# Altium PCB Stepper-Driver-v2.0.PcbDoc (part 3 of 7)
Units mil, origin at the board's own origin, x right, y up, seen from the top; angles counter-clockwise.
Board outline 5905.51 x 4330.71 mil, 4 copper layers (Top Layer, Layer 1, Layer 2, Bottom Layer), stack 62.047 mil thick; 312 components, 285 nets, 1093 pads, 969 vias.
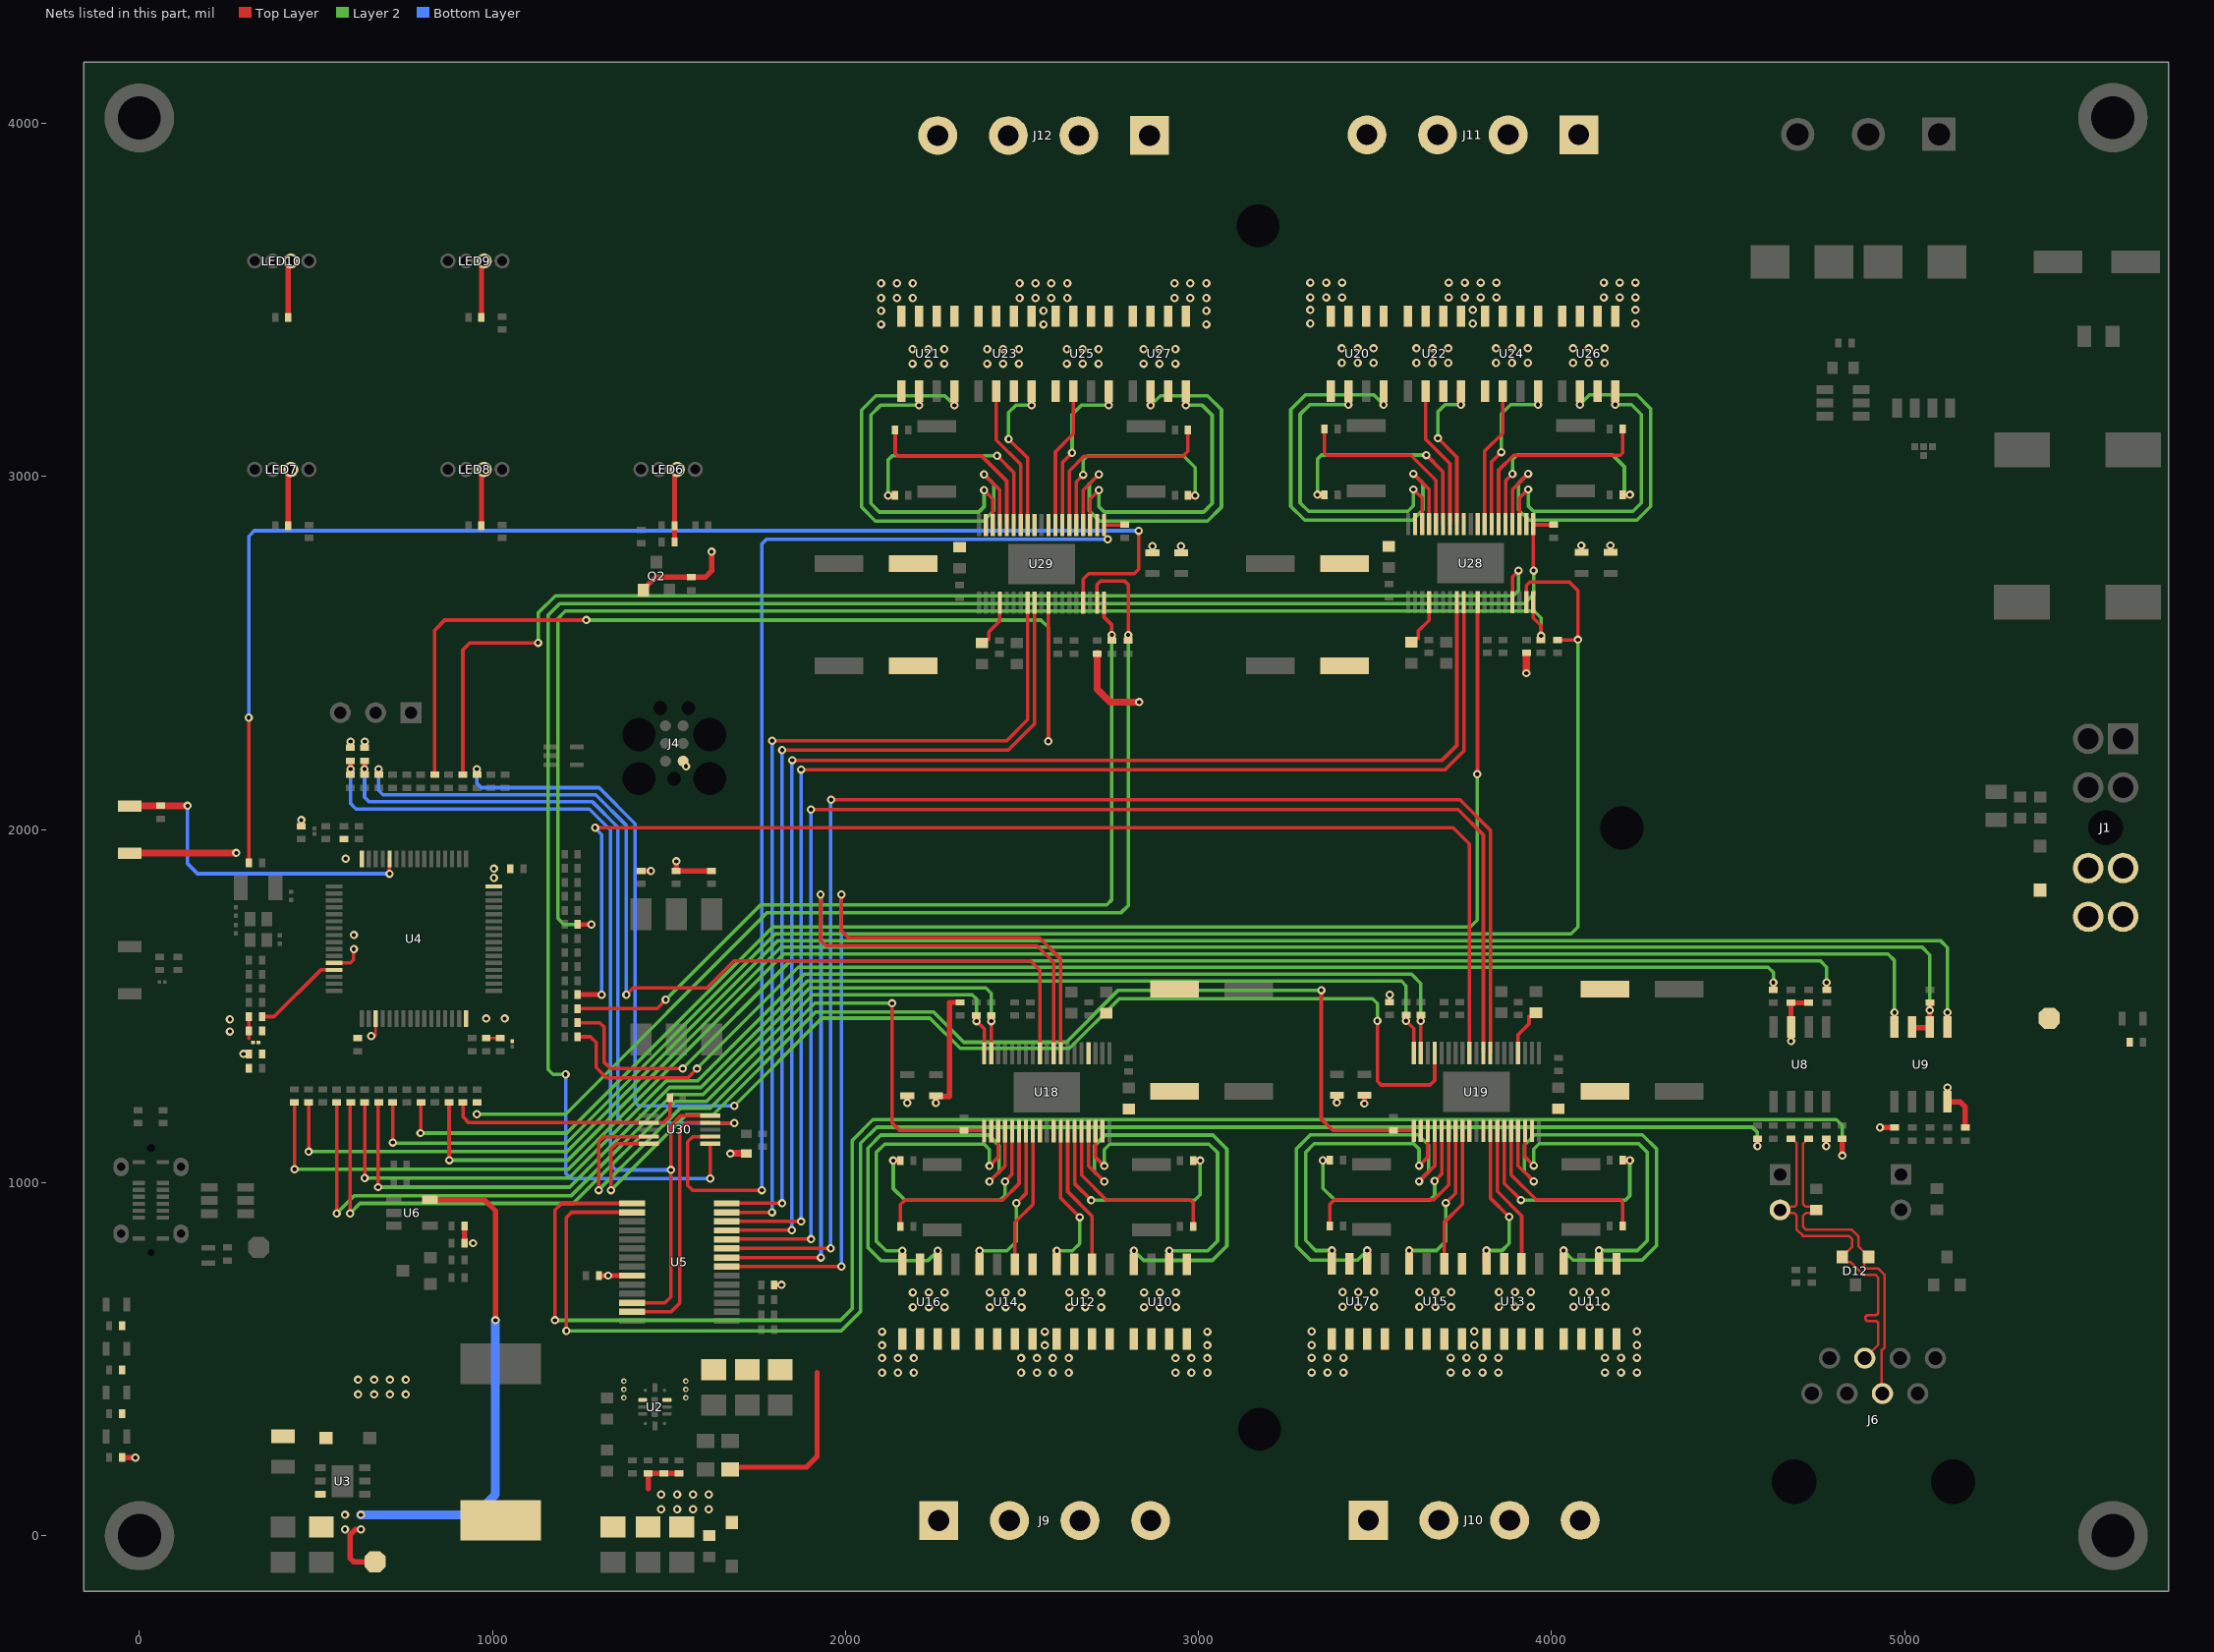
[diagram p4: the nets of this part, all layers, seen from the top]

## Part data (continued)
R70 R71 R76: library part RC0402FR-074K7L, "RES 4.7K OHM 1% 1/16W 0402", Case Code (Imperial)=0402, Case Code (Metric)=1005, LCSC Part Number=C105871, Manufacturer=Yageo, Max Operating Temperature=155°C, Max Power Dissipation=63mW, Min Operating Temperature=-55°C, Power Rating=62.5mW, Resistance=4.7kR, Resistance Tolerance=1%, Resistor Type="Thick Film", Temperature Coefficient=100ppm/°C, Voltage Rating=50V, Case/Package=0402, Category="Chip SMD Resistors", ComponentLink1Description=https://datasheet.ciiva.com/22661/1686128-22661342.pdf?src-supplier=Element14, ComponentLink1URL=https://datasheet.ciiva.com/22661/1686128-22661342.pdf?src-supplier=Element14, ComponentLink2Description=https://datasheet.ciiva.com/7850/1018594-7850022.pdf?src-supplier=Element14, ComponentLink2URL=https://datasheet.ciiva.com/7850/1018594-7850022.pdf?src-supplier=Element14, ComponentLink3Description=https://datasheet.ciiva.com/7850/1018594-7850023.pdf?src-supplier=Element14, ComponentLink3URL=https://datasheet.ciiva.com/7850/1018594-7850023.pdf?src-supplier=Element14, ComponentLink4Description=https://datasheet.ciiva.com/15215/getdatasheetpartid-328119-15215035.pdf?src-supplier=Verical, ComponentLink4URL=https://datasheet.ciiva.com/15215/getdatasheetpartid-328119-15215035.pdf?src-supplier=Verical, Construction=Rectangular, Depth=0.5mm, Features="Moisture Resistant", Height=0.32mm, Height - Seated (Max)=0.016inch, Item Type=Resistor, Lead Free="Lead Free", Length=1mm, Manufacturer Part Number=RC0402FR-074K7L, Military Standard=Not, Number of Pins=2, Number of Terminations=2, Packaging="Tape and Reel", Pricing 1="10000=0.00085 (USD)", Reach SVHC Compliant=Yes, RoHS=Yes, RoHS Compliant=Yes, Series=RC, Size Code=0402, Stock 1=2420000, Supplier 1=Avnet, Supplier Part Number 1=RC0402FR-074K7L, Termination=SMD/SMT, Tolerance=1%, Voltage Rating (DC)=50V, Width=0.5mm
R73 R75 R78: library part RC0402FR-0747KL, "RES 47K OHM 1% 1/16W 0402", Case Code (Imperial)=0402, Case Code (Metric)=1005, LCSC Part Number=C93943, Manufacturer=Yageo, Max Operating Temperature=155°C, Max Power Dissipation=63mW, Min Operating Temperature=-55°C, Package Quantity=1, Power Rating=62.5mW, Resistance=47kR, Resistance Tolerance=1%, Resistor Type="Thick Film", Temperature Coefficient=100ppm/°C, Voltage Rating=50V, Case/Package=0402, Category="Chip SMD Resistors", ComponentLink1Description=https://datasheet.ciiva.com/46412/1018594-46412839.pdf?src-supplier=Element14, ComponentLink1URL=https://datasheet.ciiva.com/46412/1018594-46412839.pdf?src-supplier=Element14, ComponentLink2Description=https://datasheet.ciiva.com/2453/pyu-r-int-thick-7-2453389.pdf?src-supplier=Digi-Key, ComponentLink2URL=https://datasheet.ciiva.com/2453/pyu-r-int-thick-7-2453389.pdf?src-supplier=Digi-Key, ComponentLink3Description=https://datasheet.ciiva.com/2453/pyu-r-int-thick-7-2453390.pdf?src-supplier=Digi-Key, ComponentLink3URL=https://datasheet.ciiva.com/2453/pyu-r-int-thick-7-2453390.pdf?src-supplier=Digi-Key, ComponentLink4Description=https://datasheet.ciiva.com/2453/pyu-r-int-thick-7-2453388.pdf?src-supplier=Digi-Key, ComponentLink4URL=https://datasheet.ciiva.com/2453/pyu-r-int-thick-7-2453388.pdf?src-supplier=Digi-Key, ComponentLink5Description=https://datasheet.ciiva.com/15189/getdatasheetpartid-323748-15189466.pdf?src-supplier=Verical, ComponentLink5URL=https://datasheet.ciiva.com/15189/getdatasheetpartid-323748-15189466.pdf?src-supplier=Verical, ComponentLink6Description=https://datasheet.ciiva.com/16793/pyu-rc0402-51-rohs-l-6-r-16793430.pdf?src-supplier=Future+Electronics, ComponentLink6URL=https://datasheet.ciiva.com/16793/pyu-rc0402-51-rohs-l-6-r-16793430.pdf?src-supplier=Future+Electronics, Construction=Rectangular, Depth=0.5mm, Features="Moisture Resistant", Height=0.016inch, Item Type=Resistor, Lead Free="Lead Free", Length=1mm, Manufacturer Part Number=RC0402FR-0747KL, Military Standard=Not, Number of Terminations=2, Packaging="Tape and Reel", Pricing 1="10000=0.00085, 20000=0.00087, 40000=0.00084, 60000=0.00083, 80000=0.00079, 100000=0.00078, 1000000=0.00076 (USD)", RoHS=Yes, RoHS Compliant=Yes, Series=RC, Size Code=0402, Stock 1=680000, Supplier 1=Avnet, Supplier Part Number 1=RC0402FR-0747KL, Termination=SMD/SMT, Tolerance=1%, Width=0.02inch
R77: library part RC0402FR-07200KL, "RES 200K OHM 1% 1/16W 0402", Case Code (Imperial)=0402, Case Code (Metric)=1005, LCSC Part Number=C114763, Manufacturer=Yageo, Max Operating Temperature=155°C, Max Power Dissipation=63mW, Min Operating Temperature=-55°C, Package Quantity=1, Resistance Tolerance=1%, Resistor Type="Thick Film", Temperature Coefficient=100ppm/°C, Voltage Rating=50V, Case/Package=0402, ComponentLink1Description=https://datasheet.ciiva.com/7849/1018594-7849897.pdf?src-supplier=Element14, ComponentLink1URL=https://datasheet.ciiva.com/7849/1018594-7849897.pdf?src-supplier=Element14, ComponentLink2Description=https://datasheet.ciiva.com/7849/1018594-7849896.pdf?src-supplier=Element14, ComponentLink2URL=https://datasheet.ciiva.com/7849/1018594-7849896.pdf?src-supplier=Element14, ComponentLink3Description=https://datasheet.ciiva.com/46394/1018594-46394953.pdf?src-supplier=Element14, ComponentLink3URL=https://datasheet.ciiva.com/46394/1018594-46394953.pdf?src-supplier=Element14, ComponentLink4Description=https://datasheet.ciiva.com/2453/pyu-r-int-thick-7-2453557.pdf?src-supplier=Digikey, ComponentLink4URL=https://datasheet.ciiva.com/2453/pyu-r-int-thick-7-2453557.pdf?src-supplier=Digikey, ComponentLink5Description=https://datasheet.ciiva.com/2453/pyu-r-int-thick-7-2453558.pdf?src-supplier=Digikey, ComponentLink5URL=https://datasheet.ciiva.com/2453/pyu-r-int-thick-7-2453558.pdf?src-supplier=Digikey, ComponentLink6Description=https://datasheet.ciiva.com/2453/pyu-r-int-thick-7-2453556.pdf?src-supplier=Digikey, ComponentLink6URL=https://datasheet.ciiva.com/2453/pyu-r-int-thick-7-2453556.pdf?src-supplier=Digikey, ComponentLink7Description=https://datasheet.ciiva.com/12667/pyu-rc0402-51-rohs-l-6-r-12667911.pdf?src-supplier=Mouser, ComponentLink7URL=https://datasheet.ciiva.com/12667/pyu-rc0402-51-rohs-l-6-r-12667911.pdf?src-supplier=Mouser, ComponentLink8Description=https://datasheet.ciiva.com/15189/getdatasheetpartid-323720-15189381.pdf?src-supplier=Verical, ComponentLink8URL=https://datasheet.ciiva.com/15189/getdatasheetpartid-323720-15189381.pdf?src-supplier=Verical, ComponentLink9Description=https://datasheet.ciiva.com/16740/pyu-rc0402-51-rohs-l-6-r-16740636.pdf?src-supplier=Future+Electronics, ComponentLink9URL=https://datasheet.ciiva.com/16740/pyu-rc0402-51-rohs-l-6-r-16740636.pdf?src-supplier=Future+Electronics, Construction=Rectangular, Depth=0.5mm, Features="Moisture Resistant", Height=0.016inch, Item Type=Resistor, Lead Free=5697LeadFree, Length=0.039inch, Manufacturer Part Number=RC0402FR-07200KL, Military Standard=Not, Number of Terminations=2, Packaging="Tape and Reel", Power Rating=63mW, Pricing="10000=0.0004, 50000=0.0008, 150000=0.0004, 300000=0.0007, 400000=0.0004, 1000000=0.0004, 2500000=0.0004, 3000000=0.0006 (USD)", Reach SVHC Compliant=Unknown, RoHS=Yes, RoHS Compliant=Yes, Series=RC, Stock=290000, Supplier="Future Electronics", Technology="THICK FILM", Termination=SMD/SMT, Tolerance=1%, Voltage Rating (DC)=50V, Width=0.02inch, Working Voltage=50V
R79: library part RC0402FR-07309KL, "RES 309K OHM 1% 1/16W 0402", Case Code (Imperial)=0402, Case Code (Metric)=1005, LCSC Part Number=C171694, Manufacturer=Yageo, Max Operating Temperature=155°C, Max Power Dissipation=63mW, Min Operating Temperature=-55°C, Power Rating=62.5mW, Supplier Part Number=2108207, Temperature Coefficient=100ppm/°C, Tolerance=1%, Voltage Rating=50V, Case/Package=0402, Category="Chip SMD Resistors", ComponentLink1Description=https://datasheet.ciiva.com/16743/pyu-rc0402-51-rohs-l-6-r-16743925.pdf?src-supplier=Future+Electronics, ComponentLink1URL=https://datasheet.ciiva.com/16743/pyu-rc0402-51-rohs-l-6-r-16743925.pdf?src-supplier=Future+Electronics, ComponentLink2Description=https://datasheet.ciiva.com/8886/pyu-rc0402-51-rohs-l-6-8886246.pdf?src-supplier=Avnet, ComponentLink2URL=https://datasheet.ciiva.com/8886/pyu-rc0402-51-rohs-l-6-8886246.pdf?src-supplier=Avnet, Contact Plating=Tin,Matte, Features="Moisture Resistant", Height=0.016inch, Item Type=Resistor, Lead Free="Lead Free", Length=0.039inch, Manufacturer Part Number=RC0402FR-07309KL, Number of Terminations=2, Packaging="Tape and Reel", Pricing="10000=0.0012, 100000=0.0011, 400000=0.0011, 1250000=0.001, 4000000=0.0009 (USD)", RoHS=Yes, RoHS Compliant=Yes, Series=RC, Stock=10000, Supplier="Future Electronics", Technology="THICK FILM", Termination=SMD/SMT, Voltage Rating (DC)=50V, Width=0.5mm, Working Voltage=50V
R80 R81: library part RC0402FR-075K1L, "RES 5.1K OHM 1% 1/16W 0402", Case Code (Imperial)=0402, Case Code (Metric)=1005, LCSC Part Number=C105872, Manufacturer=Yageo, Max Operating Temperature=155°C, Max Power Dissipation=63mW, Min Operating Temperature=-55°C, Package Quantity=1, Resistance=5.1kR, Resistance Tolerance=1%, Resistor Type="Thick Film", Temperature Coefficient=100ppm/°C, Voltage Rating=50V, Case/Package=0402, Category="Chip SMD Resistors", ComponentLink1Description=https://datasheet.ciiva.com/7983/1018594-7983519.pdf?src-supplier=Element14, ComponentLink1URL=https://datasheet.ciiva.com/7983/1018594-7983519.pdf?src-supplier=Element14, ComponentLink2Description=https://datasheet.ciiva.com/46394/1018594-46394936.pdf?src-supplier=Element14, ComponentLink2URL=https://datasheet.ciiva.com/46394/1018594-46394936.pdf?src-supplier=Element14, ComponentLink3Description=https://datasheet.ciiva.com/2453/pyu-r-int-thick-7-2453401.pdf?src-supplier=Digi-Key, ComponentLink3URL=https://datasheet.ciiva.com/2453/pyu-r-int-thick-7-2453401.pdf?src-supplier=Digi-Key, ComponentLink4Description=https://datasheet.ciiva.com/2453/pyu-r-int-thick-7-2453402.pdf?src-supplier=Digi-Key, ComponentLink4URL=https://datasheet.ciiva.com/2453/pyu-r-int-thick-7-2453402.pdf?src-supplier=Digi-Key, ComponentLink5Description=https://datasheet.ciiva.com/2453/pyu-r-int-thick-7-2453400.pdf?src-supplier=Digi-Key, ComponentLink5URL=https://datasheet.ciiva.com/2453/pyu-r-int-thick-7-2453400.pdf?src-supplier=Digi-Key, ComponentLink6Description=https://datasheet.ciiva.com/12558/pyu-rc0402-51-rohs-l-6-r-8721-12558460.pdf?src-supplier=Mouser, ComponentLink6URL=https://datasheet.ciiva.com/12558/pyu-rc0402-51-rohs-l-6-r-8721-12558460.pdf?src-supplier=Mouser, ComponentLink7Description=https://datasheet.ciiva.com/16744/pyu-rc0402-51-rohs-l-6-r-16744283.pdf?src-supplier=Future+Electronics, ComponentLink7URL=https://datasheet.ciiva.com/16744/pyu-rc0402-51-rohs-l-6-r-16744283.pdf?src-supplier=Future+Electronics, ComponentLink8Description=https://datasheet.ciiva.com/15189/getdatasheetpartid-323636-15189493.pdf?src-supplier=Verical, ComponentLink8URL=https://datasheet.ciiva.com/15189/getdatasheetpartid-323636-15189493.pdf?src-supplier=Verical, Construction=Rectangular, Depth=0.5mm, Features="Moisture Resistant", Height=0.016inch, Item Type=Resistor, Lead Free="Lead Free", Length=1mm, Manufacturer Part Number=RC0402FR-075K1L, Military Standard=Not, Number of Terminations=2, Packaging="Tape and Reel", Power Rating=63mW, Pricing 1="10000=0.00085 (USD)", RoHS=Yes, RoHS Compliant=Yes, Series=RC, Stock 1=65000, Supplier 1=Avnet, Supplier Part Number 1=RC0402FR-075K1L, Technology="THICK FILM", Termination=SMD/SMT, Tolerance=1%, Voltage Rating (DC)=50V, Width=0.02inch, Working Voltage=50V
R91 R96: library part RC0603FR-07120RL, "RES 120 OHM 1% 1/10W 0603", Case Code (Imperial)=0603, Case Code (Metric)=1608, LCSC Part Number=C114640, Manufacturer=Yageo, Max Operating Temperature=155°C, Max Power Dissipation=100mW, Min Operating Temperature=-55°C, Package Quantity=1, Resistance Tolerance=1%, Resistor Type="Thick Film", Supplier Part Number 1=311-120HRCT-ND, Temperature Coefficient=100ppm/°C, Voltage Rating=50V, Case/Package=0603, Category="Chip SMD Resistors", ComponentLink1Description=https://datasheet.ciiva.com/2553/pyu-r-int-thick-7-2553512.pdf?src-supplier=Digi-Key, ComponentLink1URL=https://datasheet.ciiva.com/2553/pyu-r-int-thick-7-2553512.pdf?src-supplier=Digi-Key, ComponentLink2Description=https://datasheet.ciiva.com/7746/443971-7746248.pdf?src-supplier=Element14, ComponentLink2URL=https://datasheet.ciiva.com/7746/443971-7746248.pdf?src-supplier=Element14, ComponentLink3Description=https://datasheet.ciiva.com/2553/pyu-r-int-thick-7-2553513.pdf?src-supplier=Digi-Key, ComponentLink3URL=https://datasheet.ciiva.com/2553/pyu-r-int-thick-7-2553513.pdf?src-supplier=Digi-Key, ComponentLink4Description=https://datasheet.ciiva.com/7746/443971-7746249.pdf?src-supplier=Element14, ComponentLink4URL=https://datasheet.ciiva.com/7746/443971-7746249.pdf?src-supplier=Element14, ComponentLink5Description=https://datasheet.ciiva.com/2553/pyu-r-int-thick-7-2553514.pdf?src-supplier=Digi-Key, ComponentLink5URL=https://datasheet.ciiva.com/2553/pyu-r-int-thick-7-2553514.pdf?src-supplier=Digi-Key, ComponentLink6Description=https://datasheet.ciiva.com/46395/443971-46395021.pdf?src-supplier=Element14, ComponentLink6URL=https://datasheet.ciiva.com/46395/443971-46395021.pdf?src-supplier=Element14, Construction=Rectangular, Depth=0.8mm, Features="Moisture Resistant", Height=0.022inch, Item Type=Resistor, Lead Free="Lead Free", Length=1.6mm, Manufacturer Part Number=RC0603FR-07120RL, Military Standard=Not, Number of Pins=2, Number of Terminations=2, Packaging="Tape and Reel", Power Rating=100mW, Pricing 1="1=0.10000, 10=0.02400, 100=0.00970, 1000=0.00436, 2500=0.00378 (USD)", REACH SVHC="No SVHC", Resistance=120R, RoHS=Yes, RoHS Compliant=Yes, Series=RC, Size Code=0603, Stock 1=839061, Supplier 1=Digi-Key, Termination=SMD/SMT, Tolerance=1%, Voltage Rating (DC)=50V, Width=0.031inch
R101 R102 R113 R114 R115 R116 R127 R128: library part RLM20FECR050, "1W 50mΩ Surface Mount Current Sensing Resistors ±50ppm/℃ ±1% 2010 Current Sense Resistors/Shunt Resistors ROHS", LCSC Part Number=C912938, Manufacturer="TA-I Tech", Package=2010, ComponentLink1Description=LCSC, ComponentLink1URL=https://www.lcsc.com/product-detail/Current-Sense-Resistors-Shunt-Resistors_TA-I-Tech-RLM20FECR050_C912938.html, Item Type="Shunt Resistor", Manufacturer Part Number=RLM20FECR050
R107 R108 R121 R122: library part RC0402FR-073K3L, "RES 3.3K OHM 1% 1/16W 0402", Case Code (Imperial)=0402, Case Code (Metric)=1005, LCSC Part Number=C137992, Manufacturer=Yageo, Max Operating Temperature=155°C, Max Power Dissipation=63mW, Min Operating Temperature=-55°C, Package Quantity=1, Power Rating=62.5mW, Resistance=3.3kR, Resistance Tolerance=1%, Resistor Type="Thick Film", Supplier Part Number 1=603-RC0402FR-073K3L, Temperature Coefficient=100ppm/°C, Voltage Rating=50V, Case/Package=0402, Category="Chip SMD Resistors", ComponentLink1Description=https://datasheet.ciiva.com/11808/0900766b80c66297-11808441.pdf?src-supplier=RSComponents, ComponentLink1URL=https://datasheet.ciiva.com/11808/0900766b80c66297-11808441.pdf?src-supplier=RSComponents, ComponentLink2Description=https://datasheet.ciiva.com/46394/1018594-46394940.pdf?src-supplier=Element14, ComponentLink2URL=https://datasheet.ciiva.com/46394/1018594-46394940.pdf?src-supplier=Element14, ComponentLink3Description=https://datasheet.ciiva.com/2453/pyu-r-int-thick-7-2453395.pdf?src-supplier=Digi-Key, ComponentLink3URL=https://datasheet.ciiva.com/2453/pyu-r-int-thick-7-2453395.pdf?src-supplier=Digi-Key, ComponentLink4Description=https://datasheet.ciiva.com/2453/pyu-r-int-thick-7-2453396.pdf?src-supplier=Digi-Key, ComponentLink4URL=https://datasheet.ciiva.com/2453/pyu-r-int-thick-7-2453396.pdf?src-supplier=Digi-Key, ComponentLink5Description=https://datasheet.ciiva.com/2453/pyu-r-int-thick-7-2453394.pdf?src-supplier=Digi-Key, ComponentLink5URL=https://datasheet.ciiva.com/2453/pyu-r-int-thick-7-2453394.pdf?src-supplier=Digi-Key, ComponentLink6Description=https://datasheet.ciiva.com/16746/pyu-rc0402-51-rohs-l-6-r-16746361.pdf?src-supplier=Future+Electronics, ComponentLink6URL=https://datasheet.ciiva.com/16746/pyu-rc0402-51-rohs-l-6-r-16746361.pdf?src-supplier=Future+Electronics, Construction=Rectangular, Depth=0.5mm, Features="Moisture Resistant", Height=0.016inch, Item Type=Resistor, Lead Free="Lead Free", Length=1mm, Manufacturer Part Number=RC0402FR-073K3L, Military Standard=Not, Number of Pins=2, Number of Terminations=2, Packaging="Tape and Reel", Pricing 1="1=0.10000, 10=0.01400, 50=0.01400, 100=0.00600, 1000=0.00300, 5000=0.00200, 10000=0.00100 (USD)", REACH SVHC="No SVHC", RoHS=Yes, RoHS Compliant=Yes, Series=RC, Size Code=0402, Stock 1=2413047, Supplier 1=Mouser, Technology="THICK FILM", Termination=SMD/SMT, Tolerance=1%, Voltage Rating (DC)=50V, Width=0.5mm
R109 R110 R111 R112 R123 R124 R125 R126: library part RC0402FR-07200RL, "RES 200 OHM 1% 1/16W 0402", Case Code (Imperial)=0402, Case Code (Metric)=1005, LCSC Part Number=C114764, Manufacturer=Yageo, Max Operating Temperature=155°C, Max Power Dissipation=63mW, Min Operating Temperature=-55°C, Package Quantity=1, Resistance Tolerance=1%, Resistor Type="Thick Film", Supplier Part Number 1=311-200LRCT-ND, Temperature Coefficient=100ppm/°C, Voltage Rating=50V, Case/Package=0402, Category="Chip SMD Resistors", ComponentLink1Description=https://datasheet.ciiva.com/2553/pyu-r-int-thick-7-2553232.pdf?src-supplier=Digi-Key, ComponentLink1URL=https://datasheet.ciiva.com/2553/pyu-r-int-thick-7-2553232.pdf?src-supplier=Digi-Key, ComponentLink2Description=https://datasheet.ciiva.com/7983/1018594-7983509.pdf?src-supplier=Element14, ComponentLink2URL=https://datasheet.ciiva.com/7983/1018594-7983509.pdf?src-supplier=Element14, ComponentLink3Description=https://datasheet.ciiva.com/16804/pyu-rc0402-51-rohs-l-6-r-16804406.pdf?src-supplier=Future+Electronics, ComponentLink3URL=https://datasheet.ciiva.com/16804/pyu-rc0402-51-rohs-l-6-r-16804406.pdf?src-supplier=Future+Electronics, ComponentLink4Description=https://datasheet.ciiva.com/15189/getdatasheetpartid-331152-15189383.pdf?src-supplier=Verical, ComponentLink4URL=https://datasheet.ciiva.com/15189/getdatasheetpartid-331152-15189383.pdf?src-supplier=Verical, ComponentLink5Description=https://datasheet.ciiva.com/7849/1018594-7849898.pdf?src-supplier=Element14, ComponentLink5URL=https://datasheet.ciiva.com/7849/1018594-7849898.pdf?src-supplier=Element14, ComponentLink6Description=https://datasheet.ciiva.com/5562/pyu-rc0402-51-rohs-l-6-r-8721-5562539.pdf?src-supplier=Mouser, ComponentLink6URL=https://datasheet.ciiva.com/5562/pyu-rc0402-51-rohs-l-6-r-8721-5562539.pdf?src-supplier=Mouser, ComponentLink7Description=https://datasheet.ciiva.com/7849/1018594-7849899.pdf?src-supplier=Element14, ComponentLink7URL=https://datasheet.ciiva.com/7849/1018594-7849899.pdf?src-supplier=Element14, ComponentLink8Description=https://datasheet.ciiva.com/2553/pyu-r-int-thick-7-2553230.pdf?src-supplier=Digi-Key, ComponentLink8URL=https://datasheet.ciiva.com/2553/pyu-r-int-thick-7-2553230.pdf?src-supplier=Digi-Key, ComponentLink9Description=https://datasheet.ciiva.com/2553/pyu-r-int-thick-7-2553231.pdf?src-supplier=Digi-Key, ComponentLink9URL=https://datasheet.ciiva.com/2553/pyu-r-int-thick-7-2553231.pdf?src-supplier=Digi-Key, Construction=Rectangular, Depth=0.5mm, Features="Moisture Resistant", Height=0.016inch, Lead Free="Lead Free", Length=1mm, Manufacturer Part Number=RC0402FR-07200RL, Military Standard=Not, Number of Terminations=2, Packaging="Tape and Reel", Power Rating=63mW, Pricing 1="1=0.10000, 10=0.01600, 100=0.00660, 1000=0.00299, 2500=0.00259, 5000=0.00214 (USD)", REACH SVHC="No SVHC", Resistance=200R, RoHS=Yes, RoHS Compliant=Yes, Series=RC, Size Code=0402, Stock 1=19778, Supplier 1=Digi-Key, Termination=SMD/SMT, Tolerance=1%, Voltage Rating (DC)=50V, Width=0.02inch
R130 R131: library part RC0402FR-07560RL, "RES 560 OHM 1% 1/16W 0402", Case Code (Imperial)=0402, Case Code (Metric)=1005, LCSC Part Number=C163460, Manufacturer=Yageo, Max Operating Temperature=155°C, Max Power Dissipation=63mW, Min Operating Temperature=-55°C, Package Quantity=1, Resistance Tolerance=1%, Resistor Type="Thick Film", Supplier Part Number=8872046, Temperature Coefficient=100ppm/°C, Voltage Rating=50V, Case/Package=0402, Category="Chip SMD Resistors", ComponentLink1Description=https://datasheet.ciiva.com/2453/pyu-r-int-thick-7-2453458.pdf?src-supplier=Digikey, ComponentLink1URL=https://datasheet.ciiva.com/2453/pyu-r-int-thick-7-2453458.pdf?src-supplier=Digikey, ComponentLink2Description=https://datasheet.ciiva.com/2453/pyu-r-int-thick-7-2453459.pdf?src-supplier=Digikey, ComponentLink2URL=https://datasheet.ciiva.com/2453/pyu-r-int-thick-7-2453459.pdf?src-supplier=Digikey, ComponentLink3Description=https://datasheet.ciiva.com/2453/pyu-r-int-thick-7-2453457.pdf?src-supplier=Digikey, ComponentLink3URL=https://datasheet.ciiva.com/2453/pyu-r-int-thick-7-2453457.pdf?src-supplier=Digikey, ComponentLink4Description=https://datasheet.ciiva.com/12558/pyu-rc0402-51-rohs-l-6-r-8721-12558383.pdf?src-supplier=Mouser, ComponentLink4URL=https://datasheet.ciiva.com/12558/pyu-rc0402-51-rohs-l-6-r-8721-12558383.pdf?src-supplier=Mouser, ComponentLink5Description=https://datasheet.ciiva.com/7850/1018594-7850042.pdf?src-supplier=Element14, ComponentLink5URL=https://datasheet.ciiva.com/7850/1018594-7850042.pdf?src-supplier=Element14, ComponentLink6Description=https://datasheet.ciiva.com/7850/1018594-7850043.pdf?src-supplier=Element14, ComponentLink6URL=https://datasheet.ciiva.com/7850/1018594-7850043.pdf?src-supplier=Element14, Construction=Rectangular, Depth=0.5mm, Features="Moisture Resistant", Height=0.016inch, Item Type=Resistor, Lead Free="Lead Free", Length=1mm, Manufacturer Part Number=RC0402FR-07560RL, Military Standard=Not, Number of Terminations=2, Packaging="Tape and Reel", Power Rating=63mW, Pricing="10000=0.0012, 100000=0.0011, 300000=0.0011, 1250000=0.001, 3000000=0.0009 (USD)", Reach SVHC Compliant=Unknown, RoHS=Yes, RoHS Compliant=Yes, Series=RC, Stock=1360000, Supplier="Future Electronics", Termination=SMD/SMT, Tolerance=1%, Width=0.02inch
SW1 SW3: "SWITCH TACTILE SPST-NO 0.05A 12V", Contact Current Rating=50mA, Contact Resistance=100mR, Insulation Resistance=100MR, LCSC Part Number=C231329, Manufacturer=Omron, Max Operating Temperature=70°C, Max Voltage Rating (DC)=12V, Min Operating Temperature=-25°C, Operating Force=1.5N, Package Quantity=1, Ratings="Dust Proof,IP40", Supplier Part Number 1=SW1020DKR-ND, Actuator Length=0.4mm, Actuator Type=Standard, ComponentLink1Description=http://www.farnell.com/datasheets/60838.pdf?src-supplier=Farnell, ComponentLink1URL=http://www.farnell.com/datasheets/60838.pdf?src-supplier=Farnell, ComponentLink2Description=http://www.farnell.com/datasheets/60838.pdf?src-supplier=Element14, ComponentLink2URL=http://www.farnell.com/datasheets/60838.pdf?src-supplier=Element14, ComponentLink3Description=https://omronfs.omron.com/en_US/ecb/products/pdf/en-b3u.pdf?src-supplier=Digi-Key, ComponentLink3URL=https://omronfs.omron.com/en_US/ecb/products/pdf/en-b3u.pdf?src-supplier=Digi-Key, ComponentLink4Description=http://www.omron.com/ecb/products/pdf/en-b3u.pdf?src-supplier=Digi-Key, ComponentLink4URL=http://www.omron.com/ecb/products/pdf/en-b3u.pdf?src-supplier=Digi-Key, ComponentLink5Description=https://www.distrelec.biz/Web/Downloads/he/et/B3U_eng_datasheet.pdf?mime=application%2Fpdf&src-supplier=Distrelec, ComponentLink5URL=https://www.distrelec.biz/Web/Downloads/he/et/B3U_eng_datasheet.pdf?mime=application%2Fpdf&src-supplier=Distrelec, ComponentLink6Description=http://www.onlinecomponents.com/productFiles/mf-OM/en-b3u.pdf?src-supplier=Onlinecomponents.com, ComponentLink6URL=http://www.onlinecomponents.com/productFiles/mf-OM/en-b3u.pdf?src-supplier=Onlinecomponents.com, ComponentLink7Description=https://www.verical.com/server-webapp/html/getDatasheet?partID=552554&src-supplier=Verical, ComponentLink7URL=https://www.verical.com/server-webapp/html/getDatasheet?partID=552554&src-supplier=Verical, ComponentLink8Description=http://www.farnell.com/datasheets/1685550.pdf?src-supplier=Element14, ComponentLink8URL=http://www.farnell.com/datasheets/1685550.pdf?src-supplier=Element14, ComponentLink9Description=http://www.farnell.com/datasheets/2610940.pdf?src-supplier=Farnell, ComponentLink9URL=http://www.farnell.com/datasheets/2610940.pdf?src-supplier=Farnell, ComponentLink10Description=https://www.alliedelec.com/m/d/4c8a9ef82804fc3c241a13c1e298fd73.pdf?src-supplier=Allied+Electronics, ComponentLink10URL=https://www.alliedelec.com/m/d/4c8a9ef82804fc3c241a13c1e298fd73.pdf?src-supplier=Allied+Electronics, Contact Material=Silver, Current Rating=50mA, Depth=2.5mm, Electrical Life=200000Cycles, Height=1.2mm, Illumination Type=Non-Illuminated,Illuminated, Item Type=Switch, Lead Free="Lead Free", Length=4mm, Manufacturer Part Number=B3U-1000P, Max Current Rating=50mA, Mechanical Life=200000Cycles, Mount="Surface Mount", Orientation=Straight, Packaging="Tape and Reel", Pricing 1="1=1, 10=0.961, 25=0.9064, 50=0.7976, 100=0.7251, 250=0.68888, 500=0.67074, 1000=0.52571 (USD)", REACH SVHC=Unknown, Stock 1=116454, Supplier 1=Digi-Key, Switch Function=Off-Mom, Switch Travel=0.15mm, Termination=SMD/SMT, Throw Configuration=SPST, Voltage Rating (DC)=12V, Weight=0.000776oz, Width=3mm
SW2: "3 positions SPST Black Flat Toggle, Raised Style SMD-6P,6x7.6mm DIP Switches ROHS", LCSC Part Number=C57453, Manufacturer="DongGuan KINGTEK Industrial Co.,LTD", Package=SMD-6P,6x7.6mm, ComponentLink1Description=LCSC, ComponentLink1URL=https://www.lcsc.com/product-detail/DIP-Switches_DongGuan-KINGTEK-Industrial-Co-LTD-DSIC03LSGET_C57453.html, Item Type="DIP Switches", Manufacturer Part Number=DSIC03LSGET
TP1 TP2 TP3: "Test Point ON", Item Type="TEST POINT"
U1: "OR Controller N+1 ORing Controller N-Channel 1:1 SOT-23-6", Case/Package=SOT-23-6, LCSC Part Number=C2941042, Manufacturer="Texas Instruments", Max Operating Temperature=125°C, Max Output current=5A, Max Supply Voltage=65V, Min Operating Temperature=-40°C, Min Supply Voltage=3.2V, Nominal Supply Current=80uA, Supplier Part Number=595-LM74700QDBVRQ1, Category="Power Management ICs", ComponentLink1Description=http://www.ti.com/general/docs/suppproductinfo.tsp?distId=10&amp;gotoUrl=http%3A%2F%2Fwww.ti.com%2Flit%2Fgpn%2Flm74700-q1&src-supplier=Digikey, ComponentLink1URL=http://www.ti.com/general/docs/suppproductinfo.tsp?distId=10&amp;gotoUrl=http%3A%2F%2Fwww.ti.com%2Flit%2Fgpn%2Flm74700-q1&src-supplier=Digikey, Height=1.45mm, Item Type=IC, Length=2.9mm, Manufacturer Part Number=LM74700QDBVRQ1, Mounting Technology="Surface Mount", Number of Outputs=1NUMBER, Pins=6NUMBER, Pricing="1=1.78, 10=1.6, 50=1.6, 100=1.28, 1000=0.877, 10000=0.756 (USD)", RoHS=Yes, RoHS Compliant=Yes, Series="Automotive, AEC-Q100", Stock=11505, Supplier=Mouser, Thickness=1.2mm, Turn-Off Delay Time=450ns, Turn-On Delay Time=1.4us, Width=1.6mm
U2: "IC REG BUCK ADJ 4A 13WQFN", LCSC Part Number=C3187981, Manufacturer="Texas Instruments", Item Type=IC, Manufacturer Part Number=LM60440AQRPKRQ1, Pricing="1=2.79, 10=1.91, 50=1.91, 100=1.71, 1000=1.52, 10000=1.45 (USD)", RoHS=Yes, Stock=916, Supplier=Mouser
U3: "IC REG LINEAR 3.3V 1.3A 6DFN", LCSC Part Number=C283488, Manufacturer=STMicroelectronics, ComponentLink1Description=https://datasheet.ciiva.com/2053/cd00186925-2053848.pdf?src-supplier=Digikey, ComponentLink1URL=https://datasheet.ciiva.com/2053/cd00186925-2053848.pdf?src-supplier=Digikey, ComponentLink2Description=https://datasheet.ciiva.com/2053/cd00186925-2053849.pdf?src-supplier=Digikey, ComponentLink2URL=https://datasheet.ciiva.com/2053/cd00186925-2053849.pdf?src-supplier=Digikey, ComponentLink3Description=https://datasheet.ciiva.com/2053/cd00186925-2053850.pdf?src-supplier=Digikey, ComponentLink3URL=https://datasheet.ciiva.com/2053/cd00186925-2053850.pdf?src-supplier=Digikey, ComponentLink4Description=https://datasheet.ciiva.com/16489/cd00186925-16489850.pdf?src-supplier=Future+Electronics, ComponentLink4URL=https://datasheet.ciiva.com/16489/cd00186925-16489850.pdf?src-supplier=Future+Electronics, Item Type=IC, Manufacturer Part Number=ST1L05APU33R, Pricing="1=1.06, 10=0.766, 25=0.692, 100=0.6103, 250=0.57136, 500=0.5479, 1000=0.5286 (USD)", RoHS=Yes, Stock=7599, Supplier=Digikey
U4: "IC MCU 32BIT 128KB FLASH 64LQFP", LCSC Part Number=C6807804, Manufacturer=STMicroelectronics, Item Type=IC, Manufacturer Part Number=STM32H503RBT6, Pricing="1=3.75, 10=2.6, 50=2.6, 100=2.28, 1000=2.09, 10000=1.98 (USD)", RoHS=No, Stock=991, Supplier=Mouser
U5: "IC XPNDR 1.7MHZ I2C 28SSOP", Case/Package=SSOP, Clock Frequency=10MHz, Frequency=1.7MHz, LCSC Part Number=C558584, Manufacturer=Microchip, Max Operating Temperature=125°C, Min Operating Temperature=-40°C, Nominal Supply Voltage=5.5V, Output Current=25mA, Package Quantity=2100, Power Dissipation=700mW, Supplier Part Number 1=MCP23017T-E/SSCT-ND, Supply Current=1mA, Category="Interface ICs", ComponentLink1Description=https://datasheet.ciiva.com/12267/21952b-12267583.pdf?src-supplier=Mouser, ComponentLink1URL=https://datasheet.ciiva.com/12267/21952b-12267583.pdf?src-supplier=Mouser, ComponentLink2Description=https://datasheet.ciiva.com/8128/21952b-8128586.pdf?src-supplier=Avnet, ComponentLink2URL=https://datasheet.ciiva.com/8128/21952b-8128586.pdf?src-supplier=Avnet, ComponentLink3Description=https://datasheet.ciiva.com/16454/filehandler-aspxddocname-en023709-16454267.pdf?src-supplier=Future+Electronics, ComponentLink3URL=https://datasheet.ciiva.com/16454/filehandler-aspxddocname-en023709-16454267.pdf?src-supplier=Future+Electronics, ComponentLink4Description=https://datasheet.ciiva.com/1780/21952b-1780738.pdf?src-supplier=Digi-Key, ComponentLink4URL=https://datasheet.ciiva.com/1780/21952b-1780738.pdf?src-supplier=Digi-Key, Interface=I2C,Serial, Item Type=IC, Lead Free="Lead Free", Manufacturer Part Number=MCP23017T-E/SS, Mounting Technology="Surface Mount", Number of Bits=16, Number of Channels=1, Number of I/Os=16, Operating Supply Voltage=5.5V, Output Type=PUSH-PULL, Packaging="Tape and Reel", Pins=28, Pricing 1="1=1.69, 25=1.4, 100=1.28 (USD)", RoHS=Yes, RoHS Compliant=Yes, Series=-, Stock 1=26314, Supplier 1=Digi-Key
U6: "IC PWR SWITCH N-CHAN 1:1 SOT23-5", Drain to Source Resistance=90mR, LCSC Part Number=C361034, Manufacturer=STMicroelectronics, Max Supply Voltage=5.5V, Min Supply Voltage=2.7V, Nominal Supply Voltage=5V, ComponentLink1Description=https://datasheet.ciiva.com/4923/cd00167470-116695-4923505.pdf?src-supplier=Mouser, ComponentLink1URL=https://datasheet.ciiva.com/4923/cd00167470-116695-4923505.pdf?src-supplier=Mouser, ComponentLink2Description=https://datasheet.ciiva.com/15108/getdatasheetpartid-66027-15108935.pdf?src-supplier=Verical, ComponentLink2URL=https://datasheet.ciiva.com/15108/getdatasheetpartid-66027-15108935.pdf?src-supplier=Verical, ComponentLink3Description=https://datasheet.ciiva.com/1962/cd00167470-1962487.pdf?src-supplier=Digikey, ComponentLink3URL=https://datasheet.ciiva.com/1962/cd00167470-1962487.pdf?src-supplier=Digikey, ComponentLink4Description=https://datasheet.ciiva.com/1962/cd00167470-1962488.pdf?src-supplier=Digikey, ComponentLink4URL=https://datasheet.ciiva.com/1962/cd00167470-1962488.pdf?src-supplier=Digikey, ComponentLink5Description=https://datasheet.ciiva.com/1962/cd00167470-1962489.pdf?src-supplier=Digikey, ComponentLink5URL=https://datasheet.ciiva.com/1962/cd00167470-1962489.pdf?src-supplier=Digikey, ComponentLink6Description=https://datasheet.ciiva.com/1512/1700527-1512630.pdf?src-supplier=Element14, ComponentLink6URL=https://datasheet.ciiva.com/1512/1700527-1512630.pdf?src-supplier=Element14, ComponentLink7Description=https://datasheet.ciiva.com/16491/cd00167470-16491224.pdf?src-supplier=Future+Electronics, ComponentLink7URL=https://datasheet.ciiva.com/16491/cd00167470-16491224.pdf?src-supplier=Future+Electronics, ComponentLink8Description=https://datasheet.ciiva.com/41457/001185713-da-01-en-ic-pwr-switch-stmps2161str-sot-23-5-stm-41457482.pdf?src-supplier=Conrad, ComponentLink8URL=https://datasheet.ciiva.com/41457/001185713-da-01-en-ic-pwr-switch-stmps2161str-sot-23-5-stm-41457482.pdf?src-supplier=Conrad, Height=1.45mm, Item Type=IC, Manufacturer Part Number=STMPS2161STR, Number of Channels=1NUMBER, Output Voltage=5V, Pricing="3000=0.42, 6000=0.41, 9000=0.405, 12000=0.405, 15000=0.395 (USD)", RoHS=Yes, Stock=3000, Supplier="Future Electronics"
U7: "6A 12V 150W 6V Unidirectional 5V SOT-23-6 ESD and Surge Protection (TVS/ESD) ROHS", LCSC Part Number=C2827654, Manufacturer="TECH PUBLIC", Package=SOT-23-6, ComponentLink1Description=LCSC, ComponentLink1URL=https://www.lcsc.com/product-detail/ESD-and-Surge-Protection-TVS-ESD_TECH-PUBLIC-USBLC6-2SC6_C2827654.html, Item Type=(TVS/ESD), Manufacturer Part Number=USBLC6-2SC6
U8: "IC TRANSCEIVER HALF 1/1 8SOIC", Case/Package=SOIC, LCSC Part Number=C22396693, Manufacturer="Texas Instruments", Height=1.75mm, Item Type=IC, Length=4.9mm, Manufacturer Part Number=TCAN3414DR, Pins=8, Pricing="1=1.55, 10=1.1, 50=1.1, 100=0.895, 1000=0.763, 10000=0.681 (USD)", RoHS=No, Stock=201, Supplier=Mouser, Thickness=1.58mm, Width=3.91mm
U9: "IC TRANSCEIVER HALF 1/1 8SOIC", LCSC Part Number=C3235059, Manufacturer="Texas Instruments", Item Type=IC, Manufacturer Part Number=THVD1449DR, Pricing="1=3.62, 10=2.51, 50=2.51, 100=2.27, 1000=2.02, 10000=1.95 (USD)", RoHS=No, Stock=7454, Supplier=Mouser
U10 U11 U12 U13 U14 U15 U16 U17 U20 U21 U22 U23 U24 U25 U26 U27: "MOSFET 2N-CH 60V 15A 8SOIC", LCSC Part Number=C117439, Manufacturer="Texas Instruments", ComponentLink1Description=https://datasheet.ciiva.com/29589/csd88537nd-29589985.pdf?src-supplier=Digikey, ComponentLink1URL=https://datasheet.ciiva.com/29589/csd88537nd-29589985.pdf?src-supplier=Digikey, ComponentLink2Description=https://datasheet.ciiva.com/46430/1857624-46430364.pdf?src-supplier=Element14, ComponentLink2URL=https://datasheet.ciiva.com/46430/1857624-46430364.pdf?src-supplier=Element14, Item Type=IC, Manufacturer Part Number=CSD88537ND, Pricing="1=1.26, 10=1.03, 50=1.03, 100=0.8, 1000=0.552, 10000=0.494 (USD)", RoHS=Yes, Stock=24825, Supplier=Mouser
U18 U19 U28 U29: "IC MTR DRV BIPOLR 8-52V 38HTSSOP", Case/Package=HTSSOP, LCSC Part Number=C60013, Manufacturer="Texas Instruments", Max Operating Temperature=85°C, Max Supply Voltage=52V, Min Operating Temperature=-40°C, Min Supply Voltage=8V, Output Current=200mA, Output Voltage=5V, Package Quantity=2000, Supply Current=17mA, ComponentLink1Description=https://datasheet.ciiva.com/24016/slvsc40d-317294-24016712.pdf?src-supplier=Mouser, ComponentLink1URL=https://datasheet.ciiva.com/24016/slvsc40d-317294-24016712.pdf?src-supplier=Mouser, Interface=SPI, Item Type=IC, Lead Free="Lead Free", Manufacturer Part Number=DRV8711DCPR, Mounting Technology="Surface Mount", Packaging="Tape and Reel", Pins=38, Pricing="1=4.97, 10=4.29, 50=4.29, 100=3.66, 1000=2.63, 10000=2.48 (USD)", Radiation Hardening=No, RoHS=Yes, RoHS Compliant=Yes, Series=-, Stock=9050, Supplier=Mouser
U30: "IC ADC 16BIT SIGMA-DELTA 10VSSOP", Case/Package=VSSOP, LCSC Part Number=C37593, Manufacturer="Texas Instruments", Max Operating Temperature=125°C, Max Supply Voltage=5.5V, Min Operating Temperature=-40°C, Min Supply Voltage=2V, Nominal Supply Current=150uA, Package Quantity=2500, Power Dissipation=900uW, Supplier Part Number=595-ADS1115IDGSR, Category="Analog to Digital Converters (ADCs)", ComponentLink1Description=https://datasheet.ciiva.com/4031/47725463s8438921n7713-4031028.pdf?src-supplier=Arrow+Electronics, ComponentLink1URL=https://datasheet.ciiva.com/4031/47725463s8438921n7713-4031028.pdf?src-supplier=Arrow+Electronics, Contact Plating=Gold, Conversion Rate=0.86KS/s, Height=1.07mm, Integral Nonlinearity (INL)=1LSB, Interface=I2C, Item Type=IC, Lead Free="Lead Free", Length=3mm, Manufacturer Part Number=ADS1115IDGSR, Max Supply Voltage (DC)=5.5V, Min Supply Voltage (DC)=2V, Number of A/D Converters=1, Number of Bits=16, Number of Channels=2, Number of Converters=1, Number of Inputs=4, Packaging="Tape and Reel", Pins=10, Polarity=Bipolar, Pricing="1=5.44, 10=4.76, 50=4.76, 100=4.01, 1000=2.88, 10000=2.78 (USD)", Reach SVHC Compliant=No, Resolution=16b, RoHS=Yes, RoHS Compliant=Yes, Sampling Rate=860S/s, Series=-, Stock=5925, Supplier=Mouser, Supply Type=Single, Thickness=1.02mm, Width=3mm
X1: library part XL7EL89COI-111YLC-24M, "24MHz Surface Mount Crystal 12pF ±10ppm ±20ppm SMD2016-4P Crystals ROHS", LCSC Part Number=C22434877, Manufacturer=YXC, Package=SMD2016-4, ComponentLink1Description=LCSC, ComponentLink1URL=https://www.lcsc.com/product-detail/Crystals_YXC-Crystal-Oscillators-XL7EL89COI-111YLC-24M_C22434877.html, Item Type=Crystal, Manufacturer Part Number=XL7EL89COI-111YLC-24M
X2: library part NX3215SA-32.768K-STD-MUA-8, "CRYSTAL 32.7680KHZ 12.5PF SMD", Case/Package=SMD/SMT, ESR (Equivalent Series Resistance)=70kR, Frequency=32.768kHz, Frequency Tolerance=20ppm, LCSC Part Number=C156245, Load Capacitance=12.5pF, Manufacturer=NDK, Max Operating Temperature=85°C, Min Operating Temperature=-40°C, Package Quantity=1000, Supplier Part Number 1=644-1156-6-ND, ComponentLink1Description=https://media.digikey.com/pdf/Data%20Sheets/NDK%20PDFs/NX3215SA-32.768K-STD-MUA-8.pdf?src-supplier=Digi-Key, ComponentLink1URL=https://media.digikey.com/pdf/Data%20Sheets/NDK%20PDFs/NX3215SA-32.768K-STD-MUA-8.pdf?src-supplier=Digi-Key, ComponentLink2Description=http://www.ndk.com/images/products/catalog/c_NX3215SA-STD-MUA-14_e.pdf?src-supplier=Digi-Key, ComponentLink2URL=http://www.ndk.com/images/products/catalog/c_NX3215SA-STD-MUA-14_e.pdf?src-supplier=Digi-Key, Height=0.035inch, Lead Free="Lead Free", Length=0.126inch, Manufacturer Part Number=NX3215SA-32.768K-STD-MUA-8, Mount="Surface Mount", Number of Pins=2, Packaging="Tape and Reel", Pricing 1="1=0.68, 10=0.602, 50=0.5628, 100=0.4974, 500=0.47124, 1000=0.3927 (USD)", Stock 1=29951, Supplier 1=Digi-Key, Width=0.059inch

## Free pads (board coordinates)
  round 196.85 hole 122.05: MH1(-0.74,4015.75) MH1(0,0) MH1(5589.82,4016.48) MH1(5590.18,0.37)
  round 0 hole 122.05: MH1(3168.63,3710.11) MH1(3172.59,301.58) MH1(4199.33,2005.07)

## Via types
v1: diameter 23.62, hole 11.81, Top Layer to Bottom Layer, tented both sides, 945 vias
v2: diameter 15.75, hole 7.87, Top Layer to Bottom Layer, 24 vias

## Nets (pads, with @x,y where several pads share a name; then routed paths per layer and width w, separated by ;. In a path a pad name is that pad's centre, name@x,y a point inside that pad or via, vN(x,y) a via of type N, cw(c..) or ccw(c..) an arc to the next point about the centre after c; other vN are vias at no path point)
3V3: C23.2 C24.2 C25.2 C26.2 C27.2 C36.1 C38.2 C39.2 C41.2 D5.2 D6.2 F1.2 FB1.2 J4.1 LED11.1 LED12.1 LED13.1 LED14.1 LED15.1 LED16.1 LED17.1 LED18.1 Q2.1 R9.1 R10.1 R11.2 R13.2 R14.2 R15.2 R61.2 R64.2 R70.1 R71.1 R72.2 R73.2 R74.2 R75.2 R82.2 R107.1 R108.1 R121.1 R122.1 R130.2 SW3.2 U4.19 U4.32 U4.48 U4.64 U5.9 U8.3 U9.8 | length 2216.4
  Top Layer w8: v1@657.25,1409.66 660.75,1409.66 668.94,1417.84 U4.19@668.94,1464.78 ; C25.2@981.93,1409.66 C23.2@1021.8,1409.66 ; R61.2@1797.83,710.54 R61.2@1797.87,710.5 ; LED13.1@2255.79,1243.52 LED13.1@2255.84,1243.56 ; R107.1@2324.45,1510.54 R107.1@2324.45,1510.54 ; R107.1@2324.49,1510.59 R107.1@2324.53,1510.63 ; LED16.1@2868.89,2781.94 LED16.1@2868.93,2781.98 ; LED16.1@2869.01,2782.06 LED16.1@2869.06,2782.11 ; LED18.1@2950.12,2782.06 LED18.1@2950.16,2782.11 ; LED12.1@3391.57,1247.44 LED12.1@3391.62,1247.48 ; LED14.1@3469.68,1244.42 LED14.1@3469.72,1244.46 ; LED15.1@4083.79,2784.21 LED15.1@4083.83,2784.25 ; LED17.1@4166.1,2784.21 LED17.1@4166.15,2784.25 ; R82.2@4777.95,1124.23 R82.2@4777.99,1124.28 ; U9.8@5121.25,1228.84 5121.25,1259.13 v1(5121.25,1269.46)
  Top Layer w10: SW3.2@-27.96,1933.14 SW3.2@-27.16,1933.94
  Top Layer w15: R73.2@920.83,828.68 R75.2@920.83,877.29 ; C36.1@1301.33,736.68 v1(1327.47,736.68) U5.9@1395.47,736.68 ; R13.2@1420.48,1883.29 1420.65,1883.12 1448.53,1883.12 v1(1448.7,1882.95) ; Q2.1@1426.82,2678.34 1426.82,2680.31 1461.46,2714.95 R64.2@1563.1,2714.95 1602.63,2714.95 1620.33,2732.65 v1(1620.33,2787.07) ; v1(1520.51,1910.21) R14.2@1520.48,1883.3 R15.2@1620.48,1883.29 ; R61.2@1797.87,710.5 v1(1818.49,710.5) ; v1(2174.73,1225.96) LED11.1@2174.73,1246.58 ; v1@2255.79,1222.89 LED13.1@2255.79,1243.52 ; v1(2255.84,1225.96) LED13.1@2255.84,1243.52 ; LED13.1@2255.84,1243.56 LED13.1@2255.84,1246.58 ; LED13.1@2255.79,1246.54 LED13.1@2255.79,1243.52 ; R107.1@2324.45,1510.54 2294.36,1510.5 2294.36,1243.52 LED13.1@2255.84,1243.52 ; LED16.1@2868.93,2781.98 v1@2868.93,2802.6 ; LED16.1@2869.06,2782.11 v1(2869.06,2802.73) ; LED18.1@2950.16,2782.11 v1(2950.16,2802.73) ; v1(3391.57,1226.82) LED12.1@3391.57,1247.44 ; v1(3469.68,1223.8) 3469.68,1244.42 LED14.1@3469.68,1247.44 ; LED15.1@4083.83,2784.25 LED15.1@4083.83,2785.07 ; v1(4083.83,2804.87) 4084.24,2804.46 4084.24,2785.48 LED15.1@4084.65,2785.07 ; LED17.1@4166.15,2784.25 v1(4166.15,2804.87) ; U8.3@4677.95,1441.44 4677.95,1508.73 C38.2@4677.45,1509.23 C39.2@4727.95,1509.23 ; v1(4777.95,1103.61) R82.2@4777.95,1124.23 ; v1(4930,1156.23) R130.2@4971.25,1156.23 ; U9.8@5121.25,1228.84 5156.79,1228.84 5171.25,1214.38 C41.2@5171.25,1156.23
  Top Layer w20: SW3.2@-27.16,1933.94 v1(273.87,1933.94) ; v1(1673.96,1082.07) 1675.03,1083.14 FB1.2@1719,1083.14 ; R122.1@2712.38,2499.14 R122.1@2712.38,2498.14 2712.38,2398.02 2749.33,2361.07 v1(2831.33,2361.07) ; v1(3928.36,2443.02) R121.1@3928.36,2500.28
  other v1: 619.33,400.07 664.33,400.07 709.33,400.07 754.33,400.07 619.33,441.71 664.33,441.71 709.33,441.71 754.33,441.71 945.01,828.55 294.07,1364.46 4677.95,1400.82 655.94,1414.94 981.93,1464.8 1034.3,1464.78 3541.31,1532.04 1003.58,1863.11 1003.58,1889.13 583.98,1917.5 458.24,2027.16 1548.03,2179.35 597.68,2249.31 637.84,2249.31
5V: C13.2 C14.2 C15.2 C16.2 C17.2 C19.2 C40.2 C42.2 C43.2 C44.2 C45.2 D4.2 L1.2 LED6.2 LED7.2 LED8.2 LED9.2 LED10.2 R4.1 R5.2 R8.1 R65.2 TP2.1 U3.3 U6.5 | length 2651.2
  Top Layer w6: 1440.79,133.61 1442.33,132.07
  Top Layer w15: R8.1@-49.21,221.07 v1(-11.68,221.07) ; C42.2@421.54,2860.63 421.54,3004.53 428.63,3011.62 LED7.2@428.63,3020.08 LED7.2@428.63,3020.63 ; C45.2@421.54,3450.63 421.54,3594.53 428.63,3601.62 LED10.2@428.63,3610.63 ; v1(626.93,17.56) 611.51,17.56 596.33,2.38 596.33,-63.93 606.33,-73.93 TP2.1@667.33,-73.93 ; U6.5@822.51,952.09 976.31,952.09 1008.33,920.07 v1(1008.33,610.07) ; C43.2@968.67,2860.63 968.67,3004.53 975.76,3011.62 LED8.2@975.76,3020.63 ; C44.2@968.67,3450.63 968.67,3594.53 975.76,3601.62 LED9.2@975.76,3610.63 ; 1440.79,133.61 R5.2@1440.79,176.34 R4.1@1528.19,176.34 ; R65.2@1515.71,2814.98 1515.71,2839.39 C40.2@1515.71,2860.28 ; 1515.71,2837.63 1515.71,3005.41 1522.92,3012.62 LED6.2@1522.92,3020.28
  Layer 2 w10: 999.33,80.07 1008.33,89.07
  Bottom Layer w25: v1(626.93,59.2) 950.78,59.2 1008.33,116.75 v1(1008.33,610.07)
  other v1: 581.93,17.56 581.93,59.2 1477.72,74.82 1522.72,74.82 1567.72,74.82 1612.72,74.82 1477.72,116.46 1522.72,116.46 1567.72,116.46 1612.72,116.46
24V: C10.2 C11.2 C12.2 C48.1 C49.1 C50.1 C51.1 C52.2 C53.2 C54.2 C55.2 C64.1 C65.1 C66.1 C67.1 C68.2 C69.2 C70.2 C71.2 D2.2 J1.3 J1.4 J1.5 J1.6 R2.1 R3.2 TP1.1 U2.2 U2.10 U10.7 U10.8 U11.7 U11.8 U12.5 U12.6 U13.5 U13.6 U14.7 U14.8 U15.7 U15.8 U16.5 U16.6 U17.5 U17.6 U18.4 U19.4 U20.7 U20.8 U21.7 U21.8 U22.5 U22.6 U23.5 U23.6 U24.7 U24.8 U25.7 U25.8 U26.5 U26.6 U27.5 U27.6 U28.4 U29.4 | length 886.1
  Top Layer w10: C71.2@2386.2,2528.64 2388.7,2528.64 C71.2@2398.7,2538.64 ; 2405.7,2538.64 2405.7,2559.78 2436.79,2590.86 U29.4@2436.79,2642.3 ; C69.2@3602.19,2530.78 3604.69,2530.78 C69.2@3614.69,2540.78 ; 3621.69,2540.78 3621.69,2561.92 3652.77,2593.01 U28.4@3652.77,2644.44 ; U19.4@3904.95,1367.24 3904.95,1418.68 3936.03,1449.77 3936.03,1470.9 ; C55.2@3943.03,1470.9 3953.03,1480.9 C55.2@3955.53,1480.9
  Top Layer w15: R3.2@1682.58,194.01 1889.03,194.01 1919.33,224.31 1919.33,461.57
  other v1: 2103.27,461.57 2148.27,461.57 2193.27,461.57 2497.15,461.57 2542.15,461.57 2587.15,461.57 2632.15,461.57 2934.49,461.57 2979.49,461.57 3024.49,461.57 3320.12,462.43 3365.12,462.43 3410.12,462.43 3713.99,462.43 3758.99,462.43 3803.99,462.43 3848.99,462.43 4151.33,462.43 4196.33,462.43 4241.33,462.43 2103.27,503.21 2148.27,503.21 2193.27,503.21 2497.15,503.21 2542.15,503.21 2587.15,503.21 2632.15,503.21 2934.49,503.21 2979.49,503.21 3024.49,503.21 3320.12,504.07 3365.12,504.07 3410.12,504.07 3713.99,504.07 3758.99,504.07 3803.99,504.07 3848.99,504.07 4151.33,504.07 4196.33,504.07 4241.33,504.07 2103.27,539.21 2564.09,539.21 3024.49,539.21 3320.12,540.07 3780.93,540.07 4241.33,540.07 2103.27,577.85 2564.09,577.85 3024.49,577.85 3320.12,578.71 3780.93,578.71 4241.33,578.71 2100.41,3430.84 2560.81,3430.84 3021.62,3430.84 3316.39,3432.98 3776.79,3432.98 4237.6,3432.98 2100.41,3469.48 2560.81,3469.48 3021.62,3469.48 3316.39,3471.62 3776.79,3471.62 4237.6,3471.62 2100.41,3505.48 2145.41,3505.48 2190.41,3505.48 2492.74,3505.48 2537.74,3505.48 2582.74,3505.48 2627.74,3505.48 2931.62,3505.48 2976.62,3505.48 3021.62,3505.48 3316.39,3507.62 3361.39,3507.62 3406.39,3507.62 3708.72,3507.62 3753.72,3507.62 3798.72,3507.62 3843.72,3507.62 4147.6,3507.62 4192.6,3507.62 4237.6,3507.62 2100.41,3547.12 2145.41,3547.12 2190.41,3547.12 2492.74,3547.12 2537.74,3547.12 2582.74,3547.12 2627.74,3547.12 2931.62,3547.12 2976.62,3547.12 3021.62,3547.12 3316.39,3549.26 3361.39,3549.26 3406.39,3549.26 3708.72,3549.26 3753.72,3549.26 3798.72,3549.26 3843.72,3549.26 4147.6,3549.26 4192.6,3549.26 4237.6,3549.26
  other v2: 1372.02,390.55 1547.47,390.55 1372.02,414.2 1547.47,414.2 1372.02,437.79 1547.47,437.79
485_DIN_1: R20.2 U9.4 | length 5128.2
  Top Layer w10: v1(438.86,1038.24) 438.9,1038.28 R20.2@438.94,1227.13 R20.2@438.94,1227.13
  Layer 2 w10: v1(438.86,1038.24) 1215.23,1038.24 1824.67,1647.68 4952.25,1647.68 4971.25,1628.68 v1(4971.25,1482.06)
485_ROUT_1: R18.2 U9.1 | length 5221.1
  Top Layer w10: v1(478.91,1087.75) 478.98,1087.82 478.98,1227.07 R18.2@479.04,1227.13
  Layer 2 w10: v1(478.91,1087.75) 1211,1087.75 1808.93,1685.68 5100.9,1685.68 5121.25,1665.34 v1(5121.25,1482.06)
A1HS-1: U10.2 U18.36 | length 929.2
  Top Layer w10: U18.36@2707.78,1145.91 2707.78,1072.04 v1(2732.52,1047.3)
  Top Layer w22: U10.2@2916.89,769.21 v1(2916.89,806.91)
  Layer 2 w10: v1(2732.52,1047.3) 2732.52,1093.98 2747.74,1109.2 3029.49,1109.2 3053.49,1085.2 3053.49,834.56 3025.84,806.91 v1(2916.89,806.91)
A1HS-2: U11.2 U19.36 | length 929.2
  Top Layer w10: U19.36@3924.63,1146.77 3924.63,1072.89 v1(3949.36,1048.16)
  Top Layer w22: U11.2@4133.72,770.07 v1(4133.72,807.77)
  Layer 2 w10: v1(3949.36,1048.16) 3949.36,1094.84 3964.58,1110.07 4246.33,1110.07 4270.33,1086.07 4270.33,835.42 4242.68,807.77 v1(4133.72,807.77)
A1HS-3: U20.2 U28.36 | length 891.5
  Top Layer w10: v1(3608.36,2963.53) 3633.09,2938.79 U28.36@3633.09,2864.92
  Layer 2 w10: v1(3423.99,3203.92) 3315.04,3203.92 3287.39,3176.27 3287.39,2925.62 3311.39,2901.62 3593.14,2901.62 3608.36,2916.84 v1(3608.36,2963.53)
A1HS-4: U21.2 U29.36 | length 929.2
  Top Layer w10: v1(2392.38,2961.38) 2417.11,2936.65 U29.36@2417.11,2862.77
  Top Layer w22: v1(2208.01,3201.77) U21.2@2208.01,3239.47
  Layer 2 w10: v1(2208.01,3201.77) 2099.06,3201.77 2071.41,3174.12 2071.41,2923.48 2095.41,2899.48 2377.15,2899.48 2392.38,2914.7 v1(2392.38,2961.38)
A1LS-1: U10.4 U18.35 | length 1281.1
  Top Layer w10: U18.35@2688.1,1145.91 2688.1,1047.3 v1(2732.52,1002.89)
  Top Layer w22: U10.4@2816.89,770.27 v1@2816.89,807.97
  Layer 2 w10: v1(2732.52,1002.89) 2705.49,1029.92 2705.49,1105.32 2734.78,1134.61 3040.34,1134.61 3079.92,1095.03 3079.92,820.76 3039.07,779.91 2843.89,779.91 v1(2816.88,806.91)
A1LS-2: U11.4 U19.35 | length 1281.1
  Top Layer w10: U19.35@3904.95,1146.77 3904.95,1048.16 v1(3949.36,1003.75)
  Top Layer w22: U11.4@4033.72,770.07 v1(4033.72,807.77)
  Layer 2 w10: v1(3949.36,1003.75) 3922.33,1030.78 3922.33,1106.18 3951.62,1135.47 4257.18,1135.47 4296.75,1095.9 4296.75,821.62 4255.91,780.77 4060.73,780.77 v1(4033.72,807.77)
A1LS-3: U20.4 U28.35 | length 1243.4
  Top Layer w10: v1(3608.36,3007.94) 3652.77,2963.53 U28.35@3652.77,2864.92
  Layer 2 w10: v1(3523.99,3203.92) 3496.99,3230.92 3301.81,3230.92 3260.96,3190.07 3260.96,2915.79 3300.54,2876.21 3606.1,2876.21 3635.39,2905.51 3635.39,2980.91 v1(3608.36,3007.94)
A1LS-4: U21.4 U29.35 | length 1281.1
  Top Layer w10: v1(2392.38,3005.8) 2436.79,2961.38 U29.35@2436.79,2862.77
  Top Layer w22: v1@2308.01,3200.72 U21.4@2308.01,3238.42
  Layer 2 w10: v1(2308.01,3201.77) 2281.01,3228.78 2085.83,3228.78 2044.98,3187.93 2044.98,2913.65 2084.56,2874.07 2390.11,2874.07 2419.41,2903.37 2419.41,2978.77 v1(2392.38,3005.8)
A2HS-1: U12.4 U18.31 | length 451.8
  Top Layer w10: U18.31@2609.36,1145.91 2609.36,955.9 v1(2663.06,902.2)
  Top Layer w22: U12.4@2598.21,769.21 v1(2598.21,806.91)
  Layer 2 w10: v1(2598.21,806.91) 2642.67,806.91 2663.07,827.31 v1(2663.06,902.2)
A2HS-2: U13.4 U19.31 | length 451.8
  Top Layer w10: U19.31@3826.21,1146.77 3826.21,956.76 v1(3879.91,903.06)
  Top Layer w22: U13.4@3815.05,770.07 v1(3815.05,807.77)
  Layer 2 w10: v1(3815.05,807.77) 3859.51,807.77 3879.91,828.17 v1(3879.91,903.06)
A2HS-3: U22.4 U28.31 | length 451.8
  Top Layer w10: v1(3677.81,3108.63) 3731.51,3054.93 U28.31@3731.51,2864.92